# Altium PCB ConnerHorn_Hat_PCB_Group26.PcbDoc
Units mm, origin at the board's own origin, x right, y up, seen from the top; angles counter-clockwise.
Board outline 64 x 85 mm, 4 copper layers (Top Layer, Ground Plane, Power Plane, Bottom Layer), stack 0.844 mm thick; 100 components, 57 nets, 298 pads, 54 vias.
Unrouted connection lines stored in the file: 5.
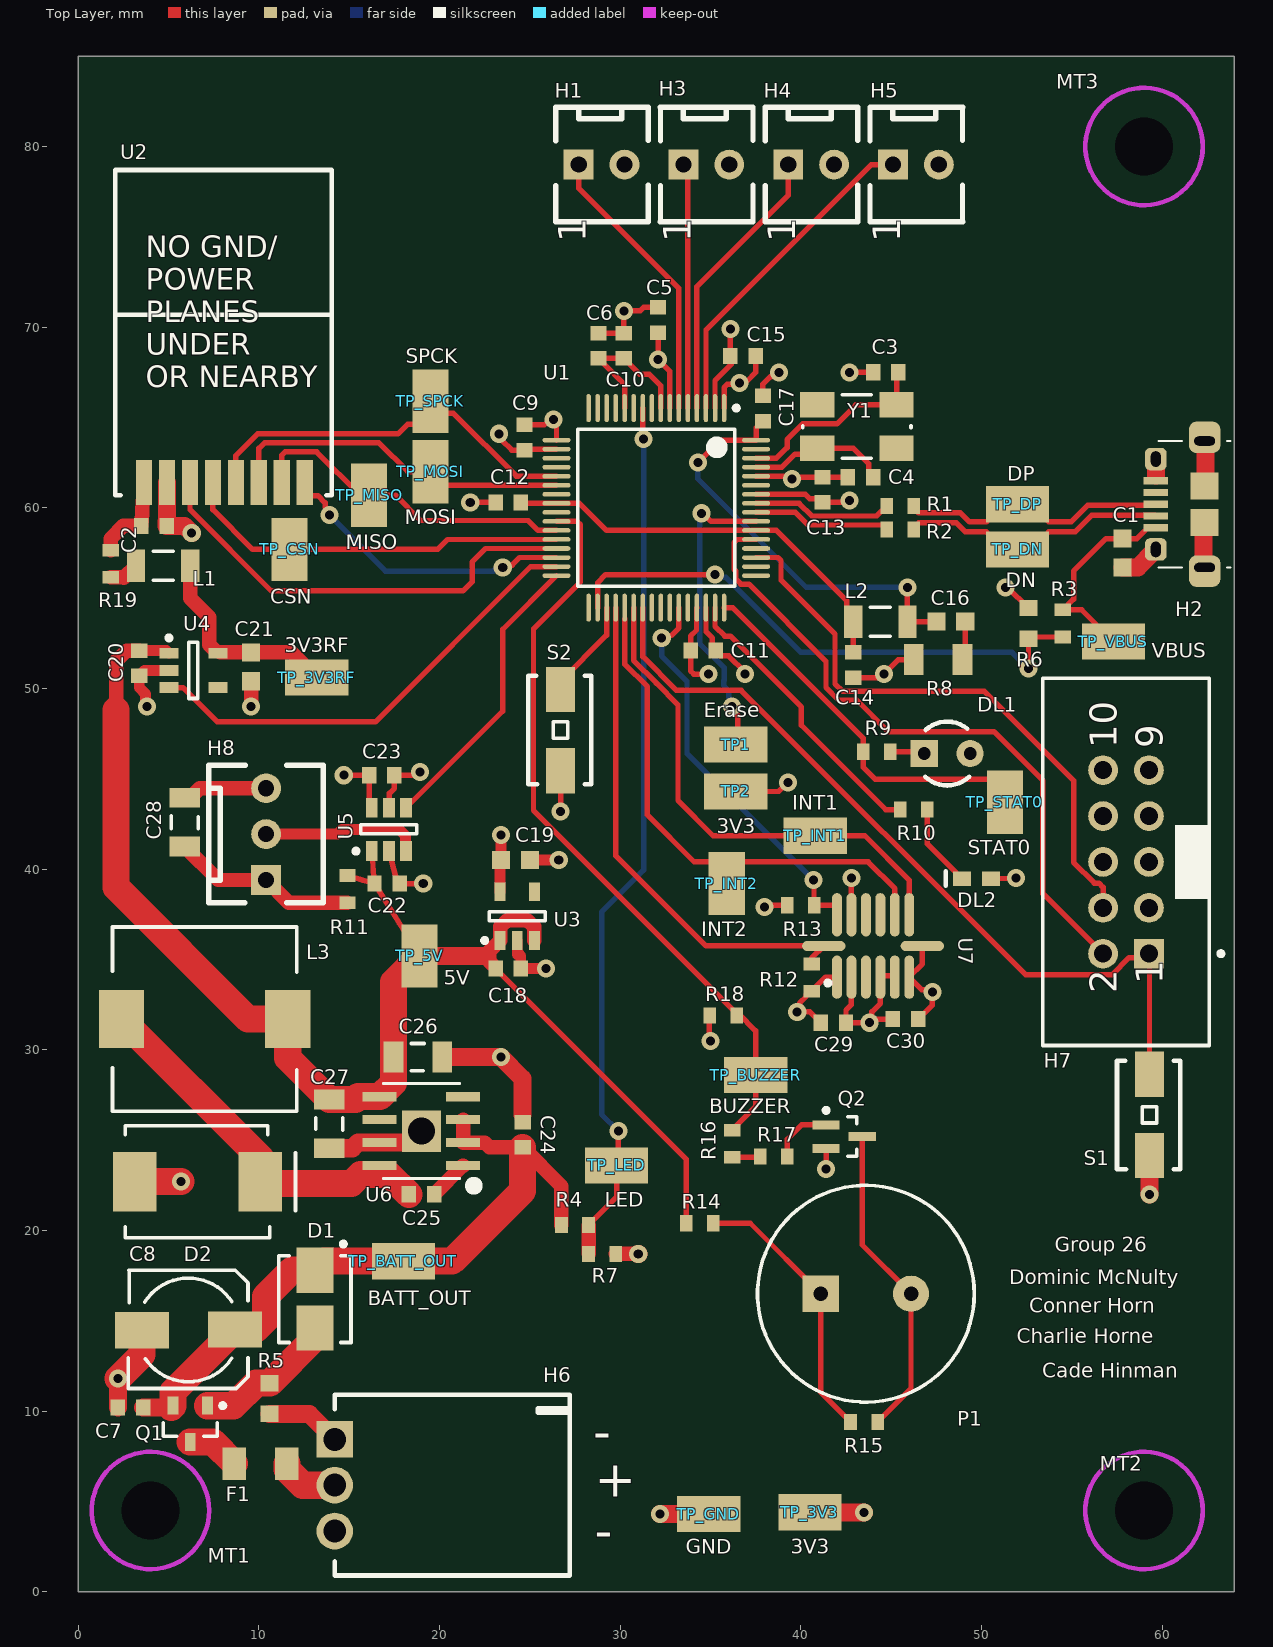
[diagram p0: Top Layer view]
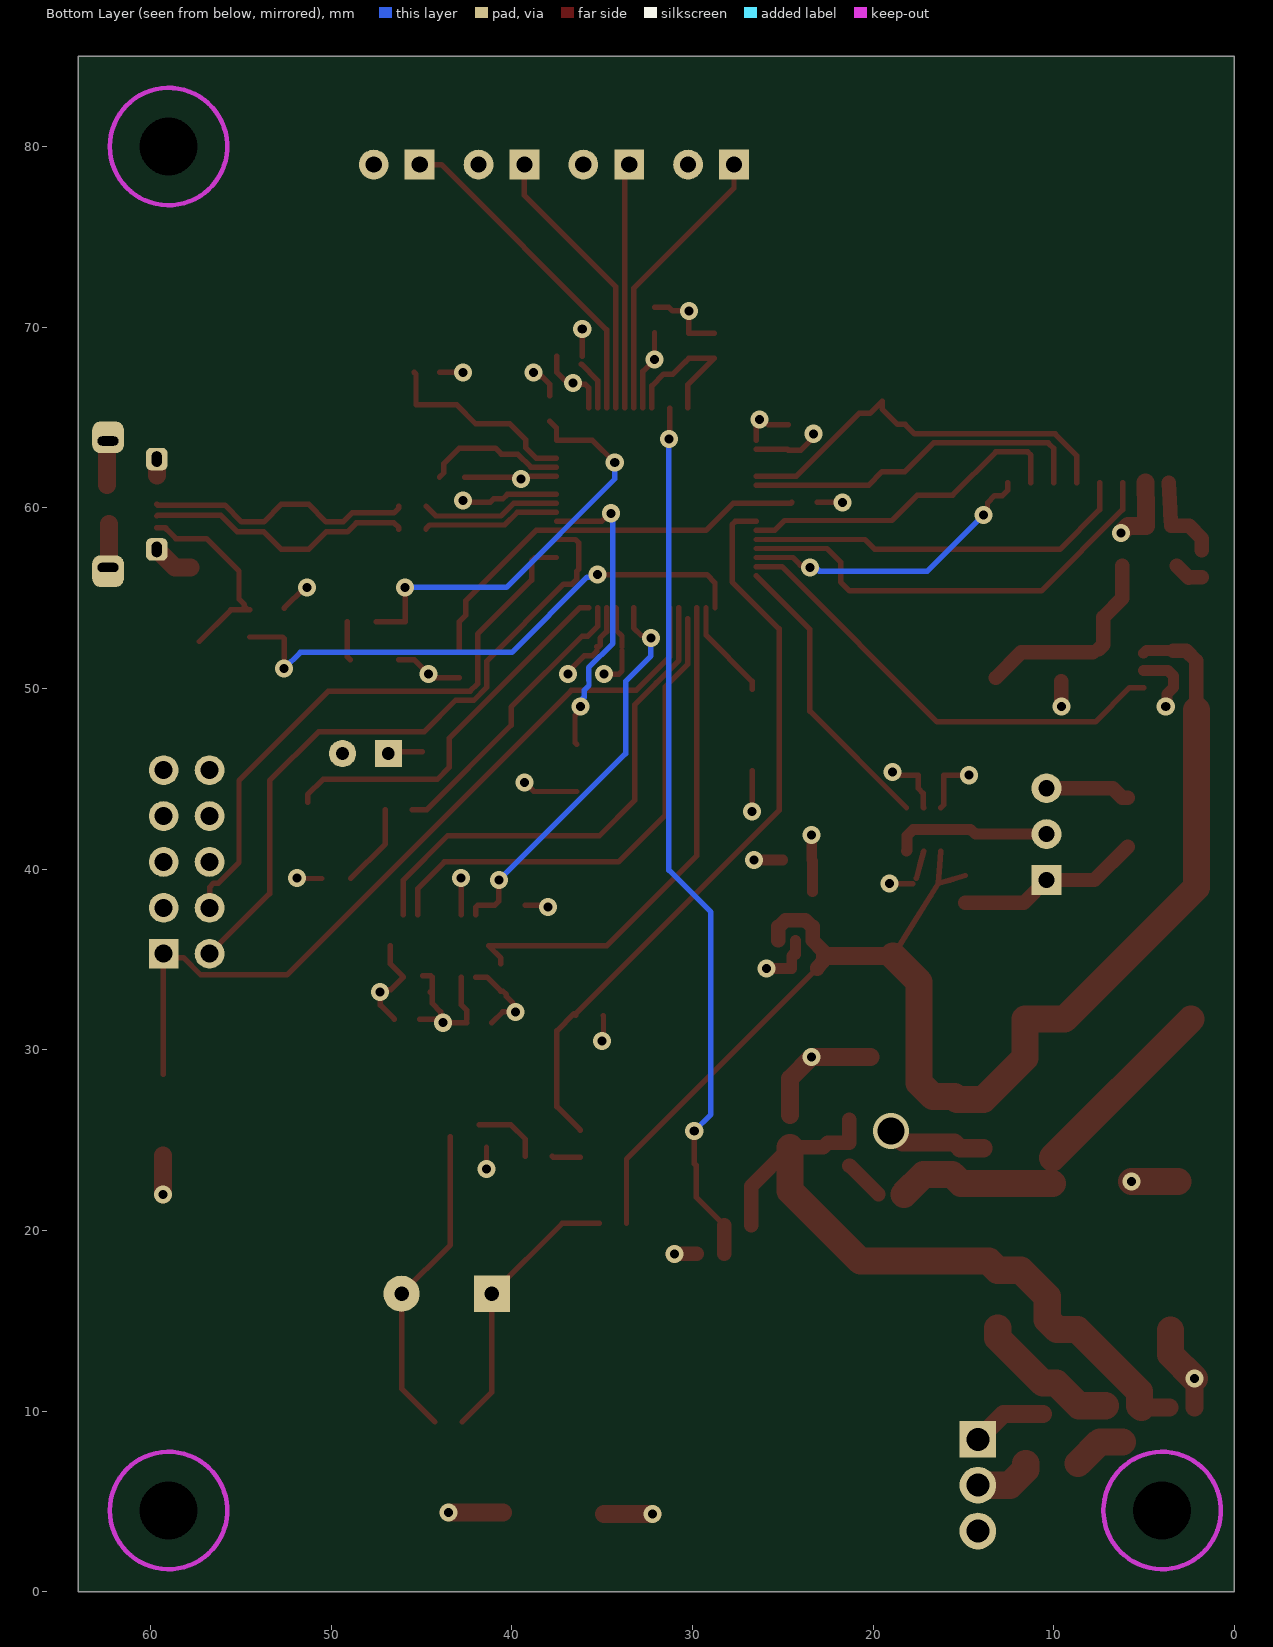
[diagram p1: Bottom Layer view, seen from below]
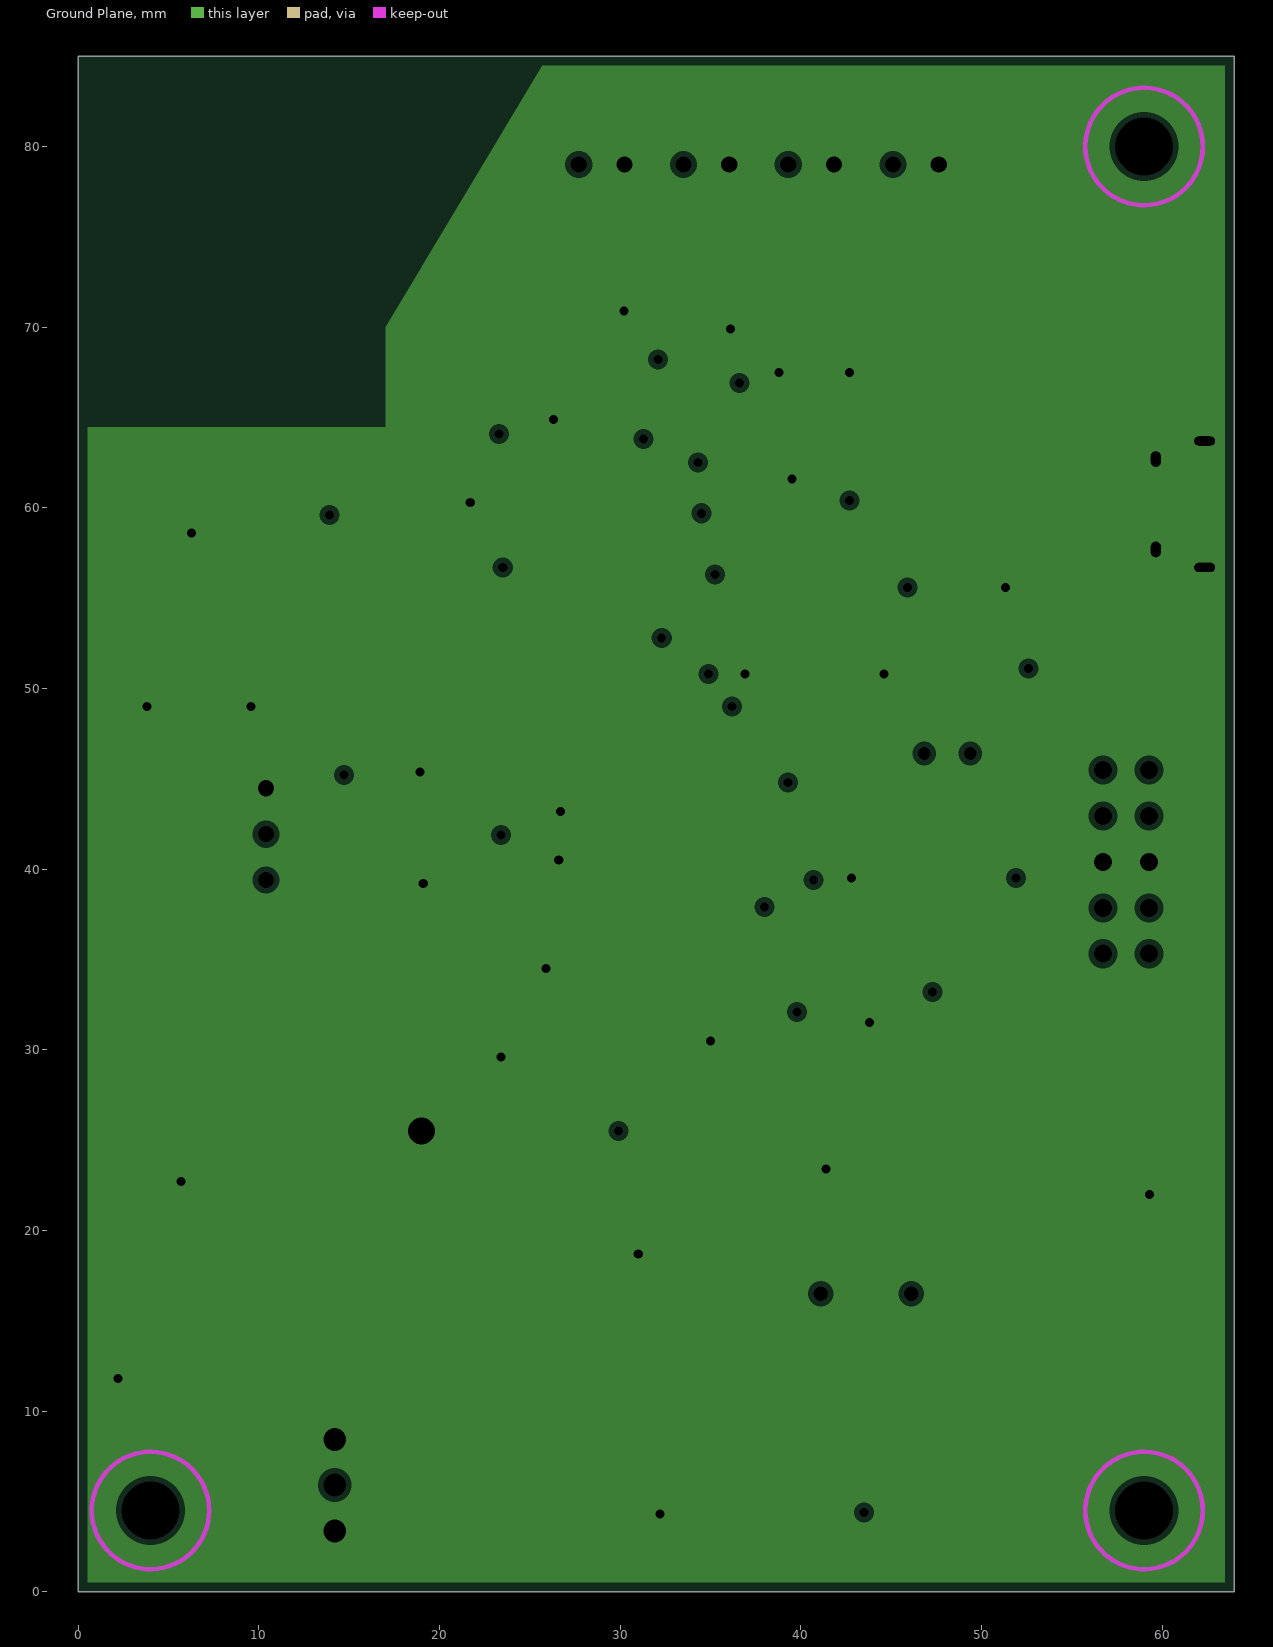
[diagram p2: Ground Plane, clearances drawn from the general rule]
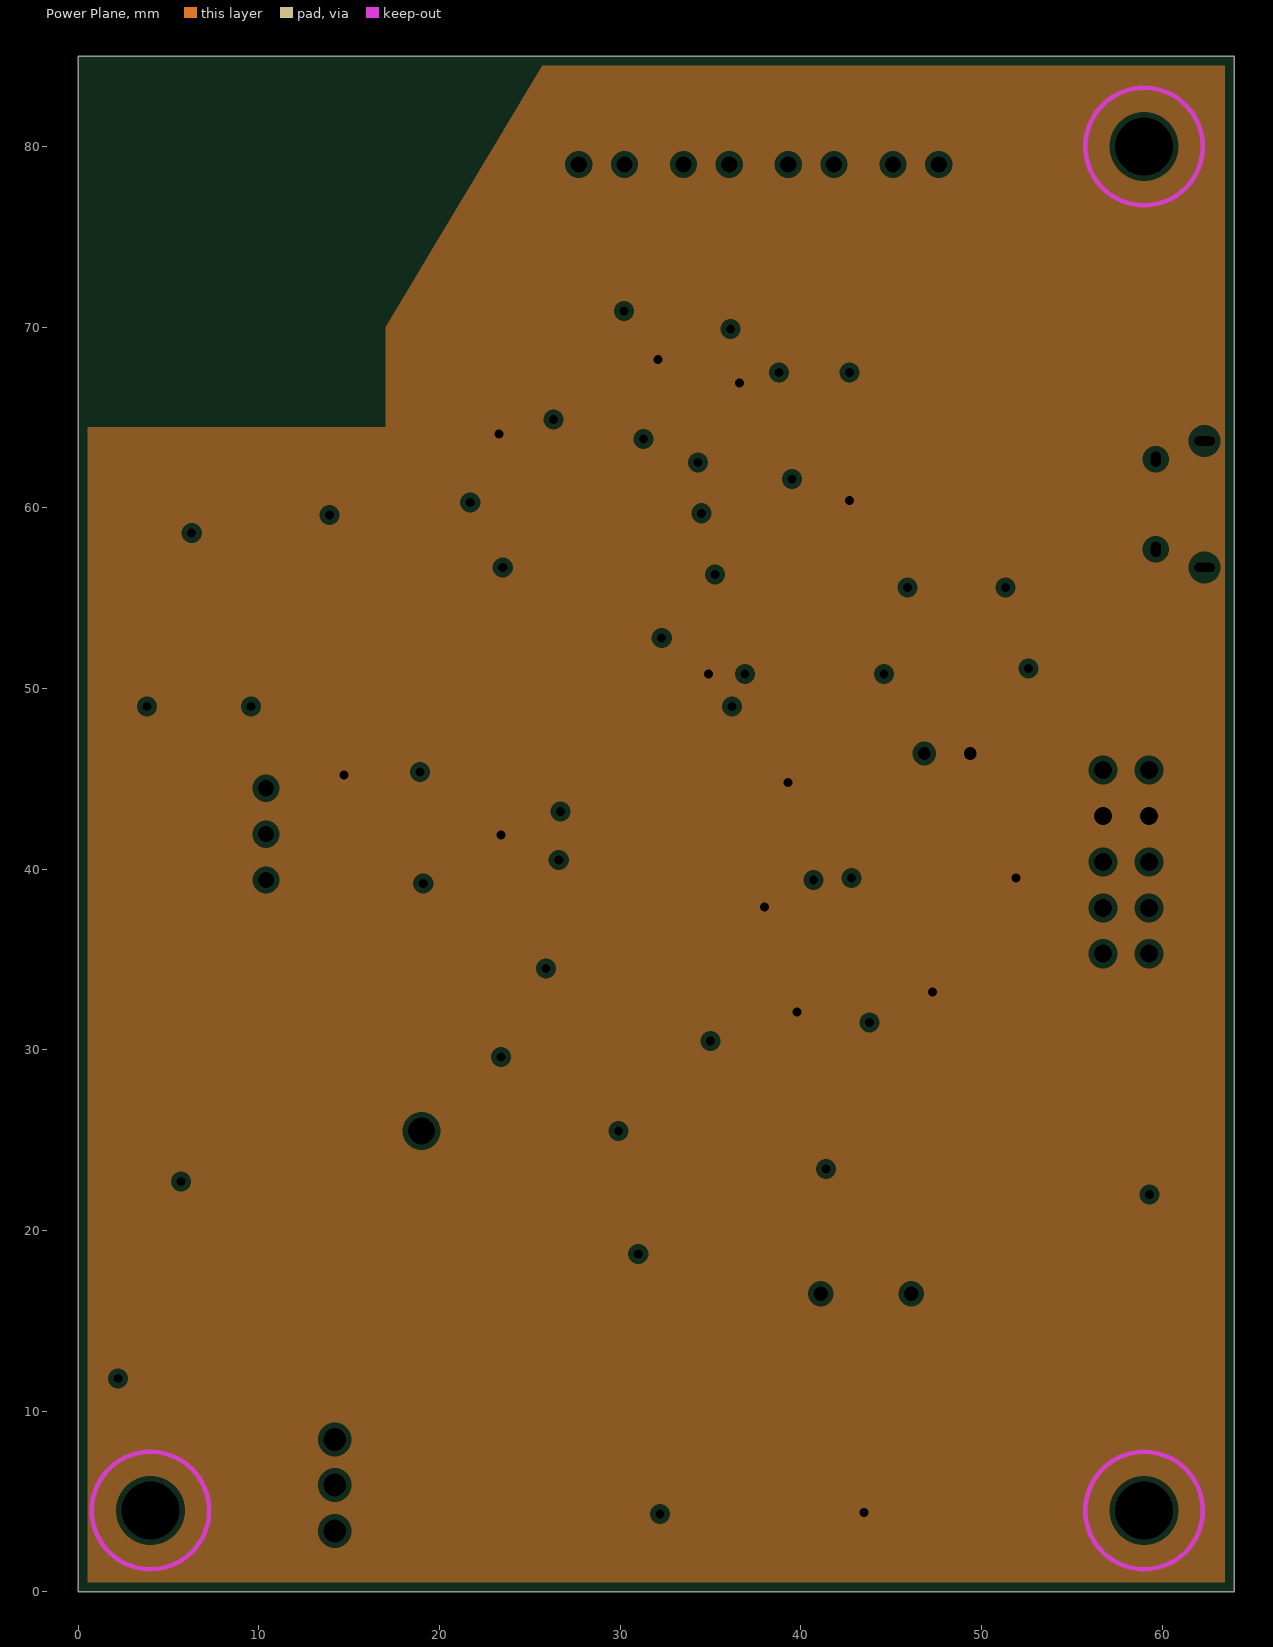
[diagram p3: Power Plane, clearances drawn from the general rule]

## Layer stack, top to bottom
Top Solder: solder mask 0.0102, Solder Resist, Dk 3.5
Top Layer: signal copper 0.0356
Dielectric 1: core 0.32, FR-4, Dk 4.8
Ground Plane: plane copper 0.036, net GND
Dielectric 3: prepreg 0.127, Dk 4.2
Power Plane: plane copper 0.036, net 3V3
Dielectric 4: core 0.254, Dk 4.2
Bottom Layer: signal copper 0.0356
Bottom Solder: solder mask 0.0102, Solder Resist, Dk 3.5

## Board outline
0,85 64,85 64,0 0,0 0,85

## Design rules (kind name [scope] priority, off if disabled: settings)
BoardOutlineClearance [All] p1: gap=0.5 ignorepadtopadclearanceinfootprint=FALSE
Clearance GND_POLY [InNamedPolygon('GND')] p1: gap=0.254 ignorepadtopadclearanceinfootprint=FALSE
Clearance Min_Clearance_Circuit_Labs [All] p2: gap=0.2 ignorepadtopadclearanceinfootprint=FALSE
DiffPairsRouting [All] p1: maxlimit=0.254 minlimit=0.2 mostfreqgap=0.254 toplayer_minwidth=0.254 toplayer_maxwidth=0.381 toplayer_prefwidth=0.381 bottomlayer_minwidth=0.254 bottomlayer_maxwidth=0.381 bottomlayer_prefwidth=0.381 maxuncoupledlength=12.7
FanoutControl Fanout_BGA [IsBGA] p1 off: bgadir=Out bgaviamode=Centered fanoutstyle=Auto fanoutdirection=Alternating viagrid=0.025 // Fanout_BGA (Default Rule)
Height [All] p1: minheight=0 maxheight=50.8 prefheight=12.7
HoleSize [All] p1: absolutevalues=TRUE maxlimit=10 minlimit=0.3 maxpercent=80.000 minpercent=20.000
MinimumAnnularRing [All] p1: minimumring=0.1
MinimumSolderMaskSliver [All] p1: minsoldermaskwidth=0.102
NetAntennae [All] p1: netantennaetolerance=1
PlaneClearance [All] p1: clearance=0.305
PlaneConnect [All] p1: planeconnectstyle=Direct reliefexpansion=0.508 reliefentries=4 reliefconductorwidth=0.254 reliefairgap=0.254
PolygonConnect [All] p1: connectstyle=Relief reliefconductorwidth=0.305 reliefentries=4 polygonreliefangle="90 Angle" airgapwidth=0.254
RoutingVias [All] p1: holewidth=0.5 width=1 viastyle="Through Hole" minholewidth=0.3 minwidth=0.8 maxholewidth=1 maxwidth=2
SMDNeckDown [All] p1 off: percent=50.000
SMDToCorner [All] p1: distance=98425
SMDToPlane [All] p1: distance=1968504
SilkToSolderMaskClearance SilkscreenOverComponentPads [IsPad] p1: minsilkscreentomaskgap=0.2 clearancetoexposedcopper=TRUE
SolderMaskExpansion [All] p1: expansion=0.102 istentingtop=FALSE
ViasUnderSMD [All] p1: allowed=FALSE
Width [All] p1: maxlimit=2 minlimit=0.2 preferedwidth=0.3
21 further rules are at their usual default settings.

## Classes and differential pairs
component class Schematic_Hat_Secondary: C29 C30 P1 Q2 R12 R13 R14 R15 R16 R17 R18 TP_3V3 TP_3V3RF TP_5V TP_BATT_OUT TP_BUZZER TP_CSN TP_DN TP_DP TP_GND TP_INT1 TP_INT2 TP_LED TP_MISO TP_MOSI TP_SPCK TP_STAT0 TP_VBUS U7
component class Schematic_Hat_Main: C1 C2 C3 C4 C5 C6 C7 C8 C9 C10 C11 C12 C13 C14 C15 C16 C17 C18 C19 C20 C21 C22 C23 C24 C25 C26 C27 C28 D1 D2 DL1 DL2 F1 H1 H2 H3 H4 H5 H6 H7 H8 L1 L2 L3 MT1 MT2 MT3 Q1 R1 R2 R3 R4 R5 R6 R7 R8 R9 R10 R11 R19 S1 S2 TP1 TP2 U1 U2 U3 U4 U5 U6 Y1
differential pair D: +D_P -D_N

## Components (designator, comment, footprint, x,y, rotation, side; value= is the part's Value field where it differs from the comment)
C1 "4.7uF" CAPC1608N 57.8,57.5 r270 top
C2 "10uF" CAPC1608L 4.2,59 r180 top
C3 "27pF" CAPC1608L 44.7,67.5 r0 top
C4 "27pF" CAPC1608L 43.3,61.7 r0 top
C5 "100nF" CAPC1608L 32.1,70.4 r270 top
C6 "100nF" CAPC1608L 28.8,68.975 r270 top
C7 "100nF" CAPC1608L 2.9,10.2 r0 top
C8 "100uF/16V" NICH-1 6.1,14.5 r0 top
C9 "100nF" CAPC1608L 24.7,63.9 r270 top
C10 "100nF" CAPC1608L 30.2,68.975 r270 top
C11 "100nF" CAPC1608L 34.6,52.1 r180 top
C12 "100nF" CAPC1608L 23.8,60.3 r0 top
C13 "100nF" CAPC1608L 41.2,61 r270 top
C14 "100nF" CAPC1608L 42.9,51.3 r90 top
C15 "100nF" CAPC1608L 36.8,68.4 r0 top
C16 "4.7uF" CAPC1608N 48.3,53.7 r180 top
C17 "100nF" CAPC1608L 37.9,65.5 r270 top
C18 "1uF" CAPC1608L 23.8,34.5 r180 top
C19 "4.7uF" CAPC1608N 24.2,40.5 r180 top
C20 "1uF" CAPC1608L 3.375,51.4 r90 top
C21 "4.7uF" CAPC1608N 9.575,51.2 r90 top
C22 "1uF" CAPC1608L 17.1,39.2 r180 top
C23 "1uF" CAPC1608L 16.8,45.2 r180 top
C24 "10uF" CAPC1608L 24.6,25.3 r270 top
C25 "100nF" CAPC1608L 19,22 r0 top
C26 "22uF" CAPC3216L 18.8,29.6 r180 top
C27 "22uF" CAPC3216L 13.9,25.9 r90 top
C28 "22uF" CAPC3216L 5.9,42.6 r270 top
C29 "1uF" CAPC1608L 41.8,31.5 r180 top
C30 "10uF" CAPC1608L 45.8,31.7 r0 top
D1 "DIODE ZENER 5.6V" DO-214AA_SCL 13.1,16.2 r270 top
D2 "MBRS330T3G 30V 4A" SMC 6.6,22.7 r0 top
DL1 "DL_LED3mm" LED3MMTH 48.1,46.4 r0 top
DL2 "Green" WL-SMCW0603 48.918,39.482 r0 top
F1 "5A" RESC3216N 10.1,7.1 r180 top
H1 "2 Pin Molex KK HDR" MOLEX_KK_2_HDR 27.7,79 r0 top
H2 "JS_USB_MICRO_B" FCI_USB_10118194-0001LF 63.8,60.2 r90 top
H3 "2 Pin Molex KK HDR" MOLEX_KK_2_HDR 33.5,79 r0 top
H4 "2 Pin Molex KK HDR" MOLEX_KK_2_HDR 39.3,79 r0 top
H5 "2 Pin Molex KK HDR" MOLEX_KK_2_HDR 45.1,79 r0 top
H6 "Battery_HEADER_3pin" BATT_HEADER_3POS 14.2,5.9 r270 top
H7 "Header 5X2 Vert" IDC2.54-V10D 58,40.4 r90 top
H8 "3 Pin Molex KK Hdr" MOLEX_KK_3_HDR 10.4,39.4 r90 top
L1 "1A max, Idc 0.3R," INDC3216L 4.7,56.8 r0 top
L2 "1A max, Idc 0.3R," INDC3216L 44.4,53.7 r180 top
L3 "IND 5.2UH 6A" INDUCTOR5u2 7,31.7 r0 top
MT1 "M3.2 NPTH" MNT-HOLE_3.2mm_NPTH 4,4.5 r0 top
MT2 "M3.2 NPTH" MNT-HOLE_3.2mm_NPTH 59,4.5 r0 top
MT3 "M3.2 NPTH" MNT-HOLE_3.2mm_NPTH 59,80 r0 top
P1 "Piezo Buzzer" BUZZER 41.1,16.5 r0 top
Q1 "SSM3J328R,LF" SOT23_L 6.2,9.3 r270 top
Q2 "BC817W" SOT323_M 42.4,25.2 r0 top
R1 "27R" RESC1608L 45.5,60.1 r180 top
R2 "27R" RESC1608L 45.5,58.8 r180 top
R3 "27K" RESC1608L 54.5,53.6 r90 top
R4 "300K" RESC1608L 27.5,20.3 r180 top
R5 "47K" RESC1608N 10.6,10.7 r90 top
R6 "47K" RESC1608N 52.6,53.6 r270 top
R7 "220K" RESC1608L 29,18.7 r180 top
R8 "1R" RESC3216L 47.6,51.6 r0 top
R9 "3K" RESC1608L 44.2,46.5 r180 top
R10 "2K" RESC1608L 46.25,43.3 r180 top
R11 "0R" RESC1608L 14.9,38.9 r90 top
R12 "2K2" RESC1608L 40.6,34 r270 top
R13 "2K2" RESC1608L 40,38 r180 top
R14 "0R" RESC1608L 34.4,20.4 r180 top
R15 "1K" RESC1608L 43.5,9.4 r180 top
R16 "10R" RESC1608L 36.2,24.8 r270 top
R17 "0R" RESC1608L 38.5,24.1 r180 top
R18 "1K" RESC1608L 35.7,31.9 r0 top
R19 "10R" RESC1608L 1.8,56.9 r270 top
S1 "EVQPNF05M" EVQPNF05M 59.3,26.4 r90 top
S2 "EVQPNF05M" EVQPNF05M 26.7,47.7 r90 top
TP1 "Erase" TP_1206 36.4,46.9 r180 top value=TP
TP2 "3V3" TP_1206 36.4,44.3 r180 top value=TP
TP_3V3 "3V3" TP_1206 40.5,4.4 r0 top value=TP
TP_3V3RF "3V3RF" TP_1206 13.2,50.6 r0 top value=TP
TP_5V "5V" TP_1206 18.9,35.2 r270 top value=TP
TP_BATT_OUT "BATT_OUT" TP_1206 18,18.3 r0 top value=TP
TP_BUZZER "BUZZER" TP_1206 37.5,28.6 r0 top value=TP
TP_CSN "CSN" TP_1206 11.7,57.7 r90 top value=TP
TP_DN "DN" TP_1206 52,57.7 r0 top value=TP
TP_DP "DP" TP_1206 52,60.2 r180 top value=TP
TP_GND "GND" TP_1206 34.9,4.3 r0 top value=TP
TP_INT1 "INT1" TP_1206 40.8,41.85 r180 top value=TP
TP_INT2 "INT2" TP_1206 35.9,39.2 r90 top value=TP
TP_LED "LED" TP_1206 29.8,23.6 r180 top value=TP
TP_MISO "MISO" TP_1206 16.1,60.7 r90 top value=TP
TP_MOSI "MOSI" TP_1206 19.5,62 r90 top value=TP
TP_SPCK "SPCK" TP_1206 19.5,65.9 r90 top value=TP
TP_STAT0 "STAT0" TP_1206 51.3,43.7 r90 top value=TP
TP_VBUS "VBUS" TP_1206 57.3,52.6 r180 top value=TP
U1 "ATSAM4S8BA-ANR" LQFP64_L 32,60 r270 top locked
U2 "nRF24 SMD" NRF24 2.043,60.7 r0 top
U3 "CAT6219-330TDGT3" SOT95P280X145-5N 24.3,37.4 r90 top
U4 "CAT6219-330TDGT3" SOT95P280X145-5N 6.375,51 r0 top
U5 "SN74LVC1T45" SOT23-6_N 17.2,42.2 r90 top
U6 "ADP2302ARDZ-5.0 BUCK" RD_8_1 19,25.5 r180 top locked value=Value
U7 "ADXL345BCCZ" ADI-CC-14-1_V 44,35.75 r90 top locked
Y1 "12MHz" 6.0X3.5-4 43.1,64.5 r0 top

## Footprints (in the part's own frame and the unit in brackets; to place one, negate y for a bottom-side part, rotate by r counter-clockwise, add the part's x,y. Pads: shape width x height; smd on the part's side, far side on the other; paste and mask are expansions set on the pad)
6.0X3.5-4 [mm] "4 SMD 6.0X3.5 mm No Lead Crystal"
  rect 1.9x1.4 smd: 1(-2.2,-1.2) 2(2.2,-1.2) 3(2.2,1.2) 4(-2.2,1.2)
  silkscreen extent -3,-1.75 3,1.75, body extent -3,-1.75 3,1.75, height 1.2
ADI-CC-14-1_V [mm]
  oval 2.4x0.55 smd: 1(-1.725,2) 2(-1.725,1.2) 3(-1.725,0.4) 4(-1.725,-0.4) 5(-1.725,-1.2) 6(-1.725,-2) 8(1.725,-2) 9(1.725,-1.2) 10(1.725,-0.4) 11(1.725,0.4) 12(1.725,1.2) 13(1.725,2)
  oval 0.55x2.4 smd: 7(0,-2.725) 14(0,2.725)
  silkscreen extent -2.18,2.37 -1.93,2.62, body extent -1.5,-2.5 1.5,2.5, height 1
BATT_HEADER_3POS [mil]
  rect 80x80 hole 50: 1(-100,0)
  round 80 hole 50: 2(0,0) 3(100,0)
  silkscreen extent -197,0 197,512, body extent -197,-31 200,504, height 294
BUZZER [mm]
  rect 2x2 hole 0.8: 1(0,0)
  round 2 hole 0.8: 2(5,0)
  silkscreen extent -3.5,-6 8.5,6, body extent -3.58,-6.08 8.58,6.08, height 6.5
CAPC1608L [mm] "Chip Capacitor, Body 1.6x0.8mm, IPC High Density"
  rect 0.8x0.9 smd: 1(-0.7,0) 2(0.7,0)
  body extent -0.87,-0.48 0.87,0.48, height 0.85
CAPC1608N [mm] "Chip Capacitor, Body 1.6x0.8mm, IPC Medium Density"
  rect 1x1 smd: 1(-0.8,0) 2(0.8,0)
  body extent -0.87,-0.48 0.87,0.48, height 0.85
CAPC3216L [mm] "Chip Capacitor, Body 3.2x1.6mm, IPC High Density"
  rect 1.1x1.7 smd: 1(-1.35,0) 2(1.35,0)
  silkscreen extent -0.35,-0.75 0.35,0.75, body extent -1.7,-0.9 1.7,0.9, height 1.35
DO-214AA_SCL [mm] "Molded Diode, 2-Leads, Body 4.40x3.62mm, IPC Medium Density"
  rect 2.5x2.05 smd: 1(-1.6,0) 2(1.6,0)
  silkscreen extent -3.17,-2 2.4,2
EVQPNF05M [mm] "Panansonic light touch SMD push button switch"
  rect 2.5x1.6 smd: 1(-2.25,0) 2(2.25,0)
  silkscreen extent -3,-1.7 3,1.8, body extent -3,-1.7 3,1.8, height 5
FCI_USB_10118194-0001LF [mm] "Micro USB B Type Receptacle"
  rect 0.4x1.35 smd mask+0.07: 1(-1.3,4.15) 2(-0.65,4.15) 3(0,4.15) 4(0.65,4.15) 5(1.3,4.15)
  rrect50% 1.75x1.75 hole 0.5 slot 1.15 at 90 deg copper offset -0.2,0 paste-2539.97 mask+0.1: 6(-3.5,1.45)
  rrect50% 1.25x1.2 hole 0.55 slot 0.85 at 0 deg: 6(-2.5,4.15) 6(2.5,4.15)
  rect 1.5x1.55 smd: 6(-1,1.45) 6(1,1.45)
  rrect50% 1.75x1.75 hole 0.5 slot 1.15 at 90 deg copper offset 0.2,0 paste-2539.97 mask+0.1: 6(3.5,1.45)
  silkscreen extent -3.5,0 3.5,4
IDC2.54-V10D [mm] "Connector; IDC, Low Profile Male Header, Thru-Hole; 10 Position; Vertical; Pitch 2.54 mm; Body 20.32 x 9.2 x 9.45 mm (LxWxH)"
  rect 1.65x1.65 hole 1: 1(-5.08,-1.27)
  round 1.65 hole 1: 2(-5.08,1.27) 3(-2.54,-1.27) 4(-2.54,1.27) 5(0,-1.27) 6(0,1.27) 7(2.54,-1.27) 8(2.54,1.27) 9(5.08,-1.27) 10(5.08,1.27)
  silkscreen extent -10.16,-5.38 10.16,4.6, body extent -10.16,-4.6 10.16,4.6, height 9.45
INDC3216L [mm] "Chip Inductor, Body 3.2x1.6mm, IPC High Density"
  rect 1x1.8 smd: 1(-1.5,0) 2(1.5,0)
  silkscreen extent -0.55,-0.8 0.55,0.8, body extent -1.75,-0.95 1.75,0.95, height 1.9
INDUCTOR5u2 [mm]
  rect 2.5x3.2 smd: 1(-4.6,0) 2(4.6,0)
  silkscreen extent -5.1,-5.1 5.1,5.1, body extent -5,-5 5,5, height 3.8
LED3MMTH [mm] "LED 3 mm Through Hole"
  rect 1.5x1.5 hole 0.7: 1(-1.27,0)
  round 1.5 hole 0.7: 2(1.27,0)
  silkscreen extent -1.22,-1.77 1.22,1.77
LQFP64_L [mm] "Thin QFP, 64-Leads, Body 10x10mm, Pitch 0.5mm, IPC High Density"
  oval 1.55x0.25 smd mask+0.07: 1(-5.525,3.75) 2(-5.525,3.25) 3(-5.525,2.75) 4(-5.525,2.25) 5(-5.525,1.75) 6(-5.525,1.25) 7(-5.525,0.75) 8(-5.525,0.25) 9(-5.525,-0.25) 10(-5.525,-0.75) 11(-5.525,-1.25) 12(-5.525,-1.75) 13(-5.525,-2.25) 14(-5.525,-2.75) 15(-5.525,-3.25) 16(-5.525,-3.75) 33(5.525,-3.75) 34(5.525,-3.25) 35(5.525,-2.75) 36(5.525,-2.25) 37(5.525,-1.75) 38(5.525,-1.25) 39(5.525,-0.75) 40(5.525,-0.25) 41(5.525,0.25) 42(5.525,0.75) 43(5.525,1.25) 44(5.525,1.75) 45(5.525,2.25) 46(5.525,2.75) 47(5.525,3.25) 48(5.525,3.75)
  oval 0.25x1.55 smd mask+0.07: 17(-3.75,-5.525) 18(-3.25,-5.525) 19(-2.75,-5.525) 20(-2.25,-5.525) 21(-1.75,-5.525) 22(-1.25,-5.525) 23(-0.75,-5.525) 24(-0.25,-5.525) 25(0.25,-5.525) 26(0.75,-5.525) 27(1.25,-5.525) 28(1.75,-5.525) 29(2.25,-5.525) 30(2.75,-5.525) 31(3.25,-5.525) 32(3.75,-5.525) 49(3.75,5.525) 50(3.25,5.525) 51(2.75,5.525) 52(2.25,5.525) 53(1.75,5.525) 54(1.25,5.525) 55(0.75,5.525) 56(0.25,5.525) 57(-0.25,5.525) 58(-0.75,5.525) 59(-1.25,5.525) 60(-1.75,5.525) 61(-2.25,5.525) 62(-2.75,5.525) 63(-3.25,5.525) 64(-3.75,5.525)
  silkscreen extent -5.65,-4.35 4.35,4.55, body extent -5,-5 5,5, height 1.6
MNT-HOLE_3.2mm_NPTH [mm] "Mounting Hole 3.2mm non plated"
  round 0 hole 3.2 unplated: 1(0,0)
  Keep-Out Layer circle w0.254: c0,0 r3.25
MOLEX_KK_2_HDR [mil] "MOLEX_KK_2_HDR"
  rect 65x65 hole 35.43: 1(0,0)
  round 65 hole 35.43: 2(100,0)
  silkscreen extent -50,-125 152,125, body extent -42,-124 152,126, height 420
MOLEX_KK_3_HDR [mil] "MOLEX_KK_3_HDR"
  rect 65x65 hole 35.43: 1(0,0)
  round 65 hole 35.43: 2(100,0) 3(200,0)
  silkscreen extent -50,-125 250,125, body extent -50,-114 250,114, height 461
NICH-1 [mm] "Electrolytic capacitor"
  rect 3x2 smd: 1(-2.561,-0.022) 2(2.584,0.011)
  silkscreen extent -3.34,-3.25 3.3,3.3, body extent -3.2,-3.2 3.2,3.2, height 5.3
NRF24 [mm]
  rect 0.9x2.5 smd: 1(1.6,0.7) 2(2.871,0.7) 3(4.143,0.7) 4(5.414,0.7) 5(6.686,0.7) 6(7.957,0.7) 7(9.229,0.7) 8(10.5,0.7)
  silkscreen extent 0,0 12,18, body extent 0,0 12,18, height 2.27
RD_8_1 [mil]
  rect 74x20 smd paste+0 mask+0: 1(-91,75) 2(-91,25) 3(-91,-25) 4(-91,-75) 5(91,-75) 6(91,-25) 7(91,25) 8(91,75)
  rect 84.65x90 smd paste-44.5 mask+0: EPAD(0,0)
  silkscreen extent -118,-104 84,123, body extent 0,0 10,10, height 10
RESC1608L [mm] "Chip Resistor, Body 1.6x0.8mm, IPC High Density"
  rect 0.7x0.9 smd: 1(-0.75,0) 2(0.75,0)
  body extent -0.85,-0.48 0.85,0.48, height 0.9
RESC1608N [mm] "Chip Resistor, Body 1.6x0.8mm, IPC Medium Density"
  rect 0.9x1 smd: 1(-0.85,0) 2(0.85,0)
  body extent -0.85,-0.48 0.85,0.48, height 0.6
RESC3216L [mm] "Chip Resistor, Body 3.1x1.6mm, IPC High Density"
  rect 1.1x1.7 smd: 1(-1.35,0) 2(1.35,0)
  body extent -1.68,-0.87 1.68,0.87, height 2.54
RESC3216N [mm] "Chip Resistor, Body 3.2x1.6mm, IPC Medium Density"
  rect 1.3x1.8 smd: 1(-1.45,0) 2(1.45,0)
  body extent -1.68,-0.87 1.68,0.87, height 0.71
SMC [mm] "DO-214-AB/SMC; 2 C-Bend Leads; Body 7.9 x 5.9 mm, inc. leads (LxW)"
  rect 2.4x3.3 smd: 1(-3.475,0) 2(3.475,0)
  silkscreen extent -4,-3.1 5.43,3.1, body extent -4.22,-2.95 3.72,2.95, height 2.27
SOT23-6_N [mm]
  rect 1.1x0.65 smd: 1(-1.2,0.95) 2(-1.2,0) 3(-1.2,-0.95) 4(1.2,-0.95) 5(1.2,0) 6(1.2,0.95)
  silkscreen extent -1.32,-1.55 0.25,1.95, body extent -0.9,-1.55 0.9,1.55, height 1.45
SOT23_L [mm] "SOT23, 3-Leads, Body 2.9x1.3mm, Pitch 0.95mm, Lead Span 2.3mm, IPC High Density"
  rect 1x0.6 smd: 1(-1,0.95) 2(-1,-0.95) 3(1,0)
  silkscreen extent -1.12,-1.5 0.7,1.93, body extent -0.7,-1.5 0.7,1.5, height 1.1
SOT95P280X145-5N [mm] "SOT23, 5-Leads, Body 2.90x2.80mm, Pitch 0.95mm, IPC Medium Density"
  rect 1.05x0.6 smd: 1(-1.35,0.95) 2(-1.35,0) 3(-1.35,-0.95) 4(1.35,-0.95) 5(1.35,0.95)
  silkscreen extent -1.47,-1.55 0.25,1.92, body extent -0.87,-1.52 0.87,1.53, height 1.45
SOT323_M [mm] "SOT323, 3-Leads, Body 2.0x1.3mm, Pitch 0.65mm, Lead Span 2.1mm, IPC Low Density"
  rect 1.5x0.5 smd: 1(-1,0.65) 2(-1,-0.65) 3(1,0)
  silkscreen extent -1.12,-1.1 0.7,1.57, body extent -0.7,-1.1 0.7,1.1, height 1.1
TP_1206 [mm] "Test Point Pad"
  rect 3.5x2 smd: 1(0,0)
  body extent -1.62,-0.85 1.63,0.8, height 2
WL-SMCW0603 [mm] "2.4 x 0.8 x 0.7mm LED"
  rect 1x0.8 smd: 1(0,0) 2(1.6,0)
  silkscreen extent -0.9,-0.4 -0.9,0.4

## Part data
C1 C16 C19 C21: library part CC_4.7uF_0603, "CAP CER 4.7uF X5R +-20%  10V 0603", Max Voltage=10V, Code_IPC=2012[0805], Note="Footprint corresponds to dimensions for bulk cassette packaging. This case size has tightened tolerances.", PackageReference=0805, Storage Location="PCB Assembly WS", Supplier="ECE Dept"
C2 C24 C30: library part CC_10uF_0603, "CAP CER 10UF X5R +-20% 6V3 0603", Voltage - Rated=6.3V, Storage Location="PCB Assembly WS", Supplier="ECE Dept"
C3 C4: library part CC_27pF_0603, "CAP CER 27pF NPO/COG +-5% 50V 0603", Code_IPC="1608 [0603]", PackageReference=0603, Storage Location="PCB Assembly WS", Supplier="ECE Dept"
C5 C6 C7 C9 C10 C11 C12 C13 C14 C15 C17 C25: library part CC_100nF_0603, "CAP CER 100nF X7R +-10% 50V 0603", Code_IPC="1608 [0603]", PackageReference=0603, Storage Location="PCB Assembly WS", Supplier="ECE Dept"
C8: library part CA_100uF_16V, "CAP ALUM 100uF 16V SMD", Manufacturer=Nichcon, Manufacturer PN=UWX1C101MCL1GB, Supplier Part Number 1=1870677, Storage Location="PCB Assembly WS", Supplier="ECE Dept", Supplier 1=Farnell, Supplier 2=Digi-Key, Supplier Part Number 2=493-2105-1-ND
C18 C20 C22 C23 C29: library part CC_1uF_0603, "CAP CER 1uF Y5V -20% +80% 16V 0603", Max Voltage=16V, Code_IPC="1608 [0603]", PackageReference=0603, Storage Location="PCB Assembly WS", Supplier="ECE Dept"
C26 C27 C28: library part CC_22uF_1206, "CAP CER 22uF Y5V -20% +80% 10V 1206", Dielectric=Y5V, Max Voltage=10V, Storage Location="PCB Assembly WS", Supplier="ECE Dept"
D1: library part SMBJ5339B-TP, "DIODE ZENER 5.6V 5W DO214AA", Base Part Number=SMBJ5339, Manufacturer="Micro Commercial Co", Operating Temperature="-55°C ~ 150°C", Package / Case="DO-214AA, SMB", Supplier Device Package="DO-214AA (SMB)", Supplier Part Number 1=SMBJ5339B-TPMSCT-ND, Tolerance=±5%, Category="Discrete Semiconductor Products", ComponentLink1Description=http://www.mccsemi.com/up_pdf/SMBJ5338B-SMBJ5388B(SMB).pdf, ComponentLink1URL=http://www.mccsemi.com/up_pdf/SMBJ5338B-SMBJ5388B(SMB).pdf, Manufacturer Part Number=SMBJ5339B-TP, Mounting Type="Surface Mount", Packaging="Cut Tape (CT)", Part Status=Active, Pricing 1="1=1.47, 10=1.277, 25=1.1312, 100=0.9853, 250=0.85764, 500=0.72988, 1000=0.58391 (NZD)", RoHS="RoHS Compliant", Stock 1=85990, Supplier 1=Digi-Key
D2: library part MBRS330T3G, "SCHOTTKY  30V 4A", Base Part Number=MBRS330, Capacitance @ Vr, F=-, Current - Average Rectified (Io)=4A, Manufacturer="ON Semiconductor", Operating Temperature - Junction="-65°C ~ 150°C", Package / Case="DO-214AB, SMC", Supplier Device Package=SMC, Supplier Part Number 1=MBRS330T3GOSCT-ND, Category="Discrete Semiconductor Products", ComponentLink1Description=http://www.onsemi.com/pub/Collateral/MBRS340T3-D.PDF, ComponentLink1URL=http://www.onsemi.com/pub/Collateral/MBRS340T3-D.PDF, Diode Type=Schottky, Manufacturer Part Number=MBRS330T3G, Mounting Type="Surface Mount", Packaging="Cut Tape (CT)", Part Status=Active, Pricing 1="1=0.93, 10=0.79, 100=0.5902, 500=0.46368, 1000=0.35829 (NZD)", RoHS="RoHS Compliant", Speed="Fast Recovery =< 500ns, > 200mA (Io)", Stock 1=8919, Supplier 1=Digi-Key
DL1: "LED 3mm Dia Thru Hole", Supplier Part Number 1=1497967, Storage Location="ECE Store", Supplier="ECE Dept", Supplier 1=Farnell
DL2: library part DL_150060GS75000, "LED Green 430mcd 0603 SMD", Forward Current If=30, Forward Voltage=3.2, Manufacturer="WURTH ELEKTRONIK", Manufacturer Part Number=150060GS75000, Supplier Part Number 1=2322070, LED Colour=Green, LED Mounting=SMD, Lens Shape=Rectangular, Luminous Intensity=430, Storage Location="PCB Assembly WS", Supplier="ECE Dept", Supplier 1=Farnell, Viewing Angle=140°, Wavelength Typ=520
F1: library part FS_Fuse_5.0A, "Fuse 5.0A Fast Acting 1206 SMD", Case Code (Imperial)=1206, Case Code (Metric)=3216, DC Cold Resistance=19mR, Manufacturer="Bel TRP", Manufacturer Part Number=C1F5, Max Operating Temperature=125°C, Min Operating Temperature=-55°C, Supplier Part Number 1=507-1886-1-ND, Voltage Rating=125V, Voltage Rating (DC)=63V, Approvals=CE,cURus, Case/Package=1206, ComponentLink1Description=http://www.farnell.com/datasheets/2571625.pdf, ComponentLink1URL=http://www.farnell.com/datasheets/2571625.pdf, ComponentLink2Description=http://belfuse.com/pdfs/C1F.pdf, ComponentLink2URL=http://belfuse.com/pdfs/C1F.pdf, ComponentLink3Description=http://www.mouser.com/ds/2/643/C1F-594910.pdf, ComponentLink3URL=http://www.mouser.com/ds/2/643/C1F-594910.pdf, ComponentLink4Description=https://belfuse.com/resources/StewartConnector/C1F.pdf, ComponentLink4URL=https://belfuse.com/resources/StewartConnector/C1F.pdf, Contact Plating=Nickel,Tin, Current Rating=5A, Fuse Type="Board Mount (Cartridge Style Excluded)", Length=0.126inch, Mount="Surface Mount", Number of Pins=2, Packaging="Tape and Reel", Pricing 1="1=0.32, 5=0.312, 10=0.298, 50=0.2662, 100=0.2479, 250=0.22032, 500=0.1836, 1000=0.17442 (USD)", Stock 1=725, Supplier 1=Digi-Key, Supplier 2=Element14, Supplier Part Number 2=2848595, Voltage Rating (AC)=125V, Width=0.062inch
H1 H3 H4 H5: library part JA_MOLEX_KK_2POS, "CONN HEADER 2POS 2.54mm VERT_Thru Hole", Supplier Part Number 1=1462926, Storage Location="ECE Dept Store", Supplier="ECE Dept", Supplier 1=Farnell
H2: library part JS_USB_MICRO_B_SMT, "CONN USB MICRO B RECPT SMT R/A", Manufacturer=FCI, Manufacturer Part Number=10118194-0001LF, Supplier Part Number 1=609-4618-1-ND, Features="Shielded, Solder Retention", Gender=Receptacle, Mounting Type="Surface Mount, Right Angle, Horizontal", Number of Contacts=5, Specifications="USB 2.0", Supplier 1=Digi-Key
H6: "3Pin Header 2.54mm spacing / Digikey #WM22663-ND", Supplier Part Number 1=WM22663-ND, Supplier 1=Digi-Key
H7: library part JA_HDR_IDC_5X2_VERT, "IDC Header, 2,54mm, 10-Pin, Vert", Supplier Part Number 1=1096985, Storage Location="ECE Dept Store", Supplier="ECE Dept", Supplier 1=Farnell
H8: library part LED_Strip_Header, "CONN HEADER 3POS 2.54mm VERT_Thru Hole", Manufacturer=Molex, Manufacturer PN=22-23-2031, Supplier Part Number 1=9731156, Storage Location="ECE Dept Store", Supplier="ECE Dept", Supplier 1=Farnell
L1 L2: library part IN_Ferrite-Bead, "Ferrite Bead, Rdc 0.3R, Z100MHZ 600R, Imax 1A, SMD 1206", DC Current Rating=1, DC Resistance Max=0.08, Ferrite Case Style="1206 ^3216 Metric]", Frequency Range="50MHz to 1", Impedance Tolerance="± 25%", Manufacturer=FAIR-RITE, Manufacturer Part Number=2512066017Y1, Supplier Part Number 1=1612060, Ferrite Mounting=SMD, Impedance=600, Manufacturer PN=2512066017Y1, Storage Location="PCB Assembly WS", Supplier="ECE Dept", Supplier 1=Farnell
L3: library part CDRH104RNP-5R2NC, "FIXED IND 5.2UH 6A 22 MOHM SMD", Current - Saturation=5.6A, DC Resistance (DCR)="22 mOhm Max", Frequency - Self Resonant=-, Manufacturer="Sumida America Components Inc.", Operating Temperature="-40°C ~ 100°C", Package / Case=Nonstandard, Supplier Part Number 1=308-2280-1-ND, Tolerance=±30%, Category="Inductors, Coils, Chokes", ComponentLink1Description=http://products.sumida.com/products/pdf/CDRH104R.pdf, ComponentLink1URL=http://products.sumida.com/products/pdf/CDRH104R.pdf, Height - Seated (Max)="0.157\" (4.00mm)", Manufacturer Part Number=CDRH104RNP-5R2NC, Material - Core=Ferrite, Mounting Type="Surface Mount", Packaging="Cut Tape (CT)", Part Status=Active, Pricing 1="1=2.9, 10=2.678, 100=1.8743, 500=1.5173 (NZD)", Q @ Freq=-, Ratings=-, RoHS="RoHS Compliant", Shielding=Shielded, Size / Dimension="0.402\" L x 0.394\" W (10.20mm x 10.00mm)", Stock 1=3849, Supplier 1=Digi-Key, Supplier Device Package=-, Type=-
MT1 MT2 MT3: library part MC_M3.2_HOLE, "Fixing M3.2 Mount Hole NPTH", Manufacturer=Hi-Q, Manufacturer PN="3BV series M3 Clearance", Price=0, Supplier="ECE Dept"
P1: "TDK - PS1240P02BT - BUZZER, PIEZO, 70DB, 12.2MM", Frequency=4kHz, Manufacturer 1=TDK, Manufacturer Part Number 1=PS1240P02BT, Max Operating Temperature=70°C, Min Operating Temperature=-10°C, Operating Supply Voltage=3V, Package Quantity=1, Supplier Part Number 1=445-2525-1-ND, ComponentLink1Description=https://datasheet.ciiva.com/0/ef532-ps-112.pdf?src-supplier=Digi-Key, ComponentLink1URL=https://datasheet.ciiva.com/0/ef532-ps-112.pdf?src-supplier=Digi-Key, ComponentLink2Description=https://datasheet.ciiva.com/0/ef532-ps-111.pdf?src-supplier=Digi-Key, ComponentLink2URL=https://datasheet.ciiva.com/0/ef532-ps-111.pdf?src-supplier=Digi-Key, ComponentLink3Description=https://datasheet.ciiva.com/3306/ef532-ps-3306958.pdf?src-supplier=Avnet, ComponentLink3URL=https://datasheet.ciiva.com/3306/ef532-ps-3306958.pdf?src-supplier=Avnet, ComponentLink4Description=https://datasheet.ciiva.com/16225/ef532-ps-16225062.pdf?src-supplier=Onlinecomponents.com, ComponentLink4URL=https://datasheet.ciiva.com/16225/ef532-ps-16225062.pdf?src-supplier=Onlinecomponents.com, Diameter=12.2mm, Height=6.5mm, Lead Free="Lead Free", Mount="Through Hole", Number of Pins=2, Number of Terminals/Pins=2, Packaging="Tape and Reel", Pricing 1="1=0.61000, 10=0.52500, 25=0.49120, 50=0.46580, 100=0.44110 (USD)", RoHS=Yes, RoHS Compliant=Yes, Series=PS, Stock 1=24025, Supplier 1=Digi-Key, Termination="PC Pins", Voltage Rating (DC)=3V, Washable=No
Q1: library part TM_SSM3J328R, "MOSFET P-CH 20V 6A SOT23-3", Case/Package=SOT-23-3, Continuous Drain Current (ID)=6A, Drain to Source Breakdown Voltage=-20V, Drain to Source Resistance=47.4mR, Drain to Source Voltage (Vdss)=20V, Gate to Source Voltage (Vgs)=8V, Input Capacitance=840pF, Input Capacitance (Ciss) @ Vds="840pF @ 10V", Manufacturer=Toshiba, Max Operating Temperature=150°C, Max Power Dissipation=1W, Min Operating Temperature=-55°C, Package / Case="SOT-23-3 Flat Leads", Package Quantity=3000, Power Dissipation=2W, Supplier Device Package=SOT-23F, Supplier Part Number=SSM3J328RLFDKR-ND, ComponentLink1Description=https://datasheet.ciiva.com/11158/ssm3j328r-datasheet-en-20140301-11158652.pdf, ComponentLink1URL=https://datasheet.ciiva.com/11158/ssm3j328r-datasheet-en-20140301-11158652.pdf, Current - Continuous Drain (Id) @ 25° C=6A, Element Configuration=Single, FET Feature="Logic Level Gate, 1.5V Drive", FET Type="MOSFET P-Channel, Metal Oxide", Gate Charge (Qg) @ Vgs="12.8nC @ 4.5V", Manufacturer Part Number=SSM3J328R,LF, Mount="Surface Mount", Number of Channels=1, Number of Elements=1, Number of Pins=3, Packaging="Tape and Reel", Power - Max=1W, Pricing="1=0.79, 10=0.658, 25=0.5772, 100=0.4939, 250=0.42836, 500=0.36284, 1000=0.27972 (NZD)", Radiation Hardening=No, Rds On Max=29.8mR, Storage Location="PCB Assembly WS", Supplier=Digi-Key, Supplier 1=Digi-Key, Supplier Part Number 1=SSM3J328RLFDKR-ND, Turn-Off Delay Time=107ns, Turn-On Delay Time=32ns, Vgs(th) (Max) @ Id="1V @ 1mA"
Q2: library part TB_BC817W, "NPN GP Bipolar Transistor 45V 500mA SOT323", Manufacturer=NXP, Supplier Part Number 1=2114873, Manufacturer PN=BC817W, Storage Location="PCB Assembly WS", Supplier="ECE Dept", Supplier 1=Farnell, Supplier 2=Digi-Key, Supplier Part Number 2=1727-4843-1-ND
R1 R2: library part RS_27R, "RES 27 OHM 1/10W 5% 0603 SMD", Storage Location="PCB Assembly WS", Supplier="ECE Dept"
R3: library part RS_27K, "RES 27K OHM 1/10W 5% 0603 SMD", Storage Location="PCB Assembly WS", Supplier="ECE Dept"
R4: library part RS_300K, "RES 300K OHM 1/10W 5% 0603 SMD", Storage Location="PCB Assembly WS", Supplier="ECE Dept"
R5 R6: library part RS_47K, "RES 47.0K OHM 1/10W 5% 0603 SMD", Storage Location="PCB Assembly WS", Supplier="ECE Dept"
R7: library part RS_220K, "RES 3.3K OHM 1/10W 5% 0603 SMD", Storage Location="PCB Assembly WS", Supplier="ECE Dept"
R8: library part RT_1R, "RES 1R OHM 1/4W 5% 1206 SMD", Storage Location="PCB Assembly WS", Supplier="ECE Dept"
R9: library part RS_3K, "RES 3K OHM 1/10W 5% 0603 SMD", Storage Location="PCB Assembly WS", Supplier="ECE Dept"
R10: library part RS_2K, "RES 2K OHM 1/10W 5% 0603 SMD", Storage Location="PCB Assembly WS", Supplier="ECE Dept"
R11 R14 R17: library part RS_0R0, "RES 0.0 OHM 1/10W 5% 0603 SMD", Storage Location="PCB Assembly WS", Supplier="ECE Dept"
R12 R13: library part RS_2K2, "RES 2.2K OHM 1/10W 5% 0603 SMD", Storage Location="PCB Assembly WS", Supplier="ECE Dept"
R15 R18: library part RS_1K, "RES 1.0K OHM 1/10W 5% 0603 SMD", Storage Location="PCB Assembly WS", Supplier="ECE Dept"
R16 R19: library part RS_10R, "RES 10 OHM 1/10W 5% 0603 SMD", Storage Location="PCB Assembly WS", Supplier="ECE Dept"
S1 S2: library part WS_EVQPNF05M, "Panasonic 6 x 3.5mm SMD Light Touch Switch Type SMD", Manufacturer=Panasonic, Supplier Part Number 1=2079481, Manufacturer PN=EVQPNF05M, PackageDescription="6.0 x 3.5 mm", Storage Location="PCB Assembly WS", Supplier="ECE Dept", Supplier 1=Farnell, Supplier 2=Digi-Key, Supplier Part Number 2=P13598SCT-ND
TP1 TP2 TP_3V3 TP_3V3RF TP_5V TP_BATT_OUT TP_BUZZER TP_CSN TP_DN TP_DP TP_GND TP_INT1 TP_INT2 TP_LED TP_MISO TP_MOSI TP_SPCK TP_STAT0 TP_VBUS: library part TP_1206, "Test-Point 3.3x1.6x2.1mm SMD", Manufacturer="Harwin Inc", Manufacturer Part Number=S1751-46R, Supplier Part Number 1=952-1478-2-ND, Mounting Type="Surface Mount", Storage Location=ProtoPlace, Supplier="ECE Dept", Supplier 1=Digi-Key, Supplier 2=Farnell, Supplier Part Number 2=1826282, Type="PC Test Point"
U1: library part SE_ATSAM4S16BA-MU, "IC MCU 32BIT 512KB FLASH 64LQFP", Manufacturer=Atmel, Package / Case=64-LQFP, Supplier Part Number 1=ATSAM4S8BA-ANRCT-ND, Voltage - Supply (Vcc/Vdd)="1.62 V ~ 3.6 V", Code_JEDEC=MO-220VMMD-3, ComponentLink1Description="Manufacturer URL", ComponentLink1URL=http://www.atmel.com/, ComponentLink2Description="SAM4S Series Datasheet", ComponentLink2URL=http://www.atmel.com/dyn/resources/prod_documents/11100.pdf, ComponentLink3Description="SAM4S Series Summary", ComponentLink3URL=http://www.atmel.com/dyn/resources/prod_documents/11100S.pdf, Connectivity="I²C, IrDA, Memory Card, SPI, SSC, UART/USART, USB", Core Processor="ARM® Cortex®-M4", Core Size=32-Bit, Data Converters="A/D 11x12b, D/A 2x12b", Manufacturer Part Number=ATSAM4S8BA-ANR, Number of I/O=47, PackageDescription="64-Pin Quad Flat No-Lead (QFN) Sawn, 9 x 9 x 1.0 mm Body, 0.5 mm Pitch, Exposed Pad", PackageReference=64PS, PackageVersion="revJ, Jul-2007", Packaging="Cut Tape (CT)", Peripherals="Brown-out Detect/Reset, DMA, POR, PWM, WDT", Program Memory Size="512KB (512K x 8)", Program Memory Type=FLASH, RAM Size="128K x 8", Speed=120MHz, Supplier 1=Digi-Key
U2: library part NRF24, "nRF24 SMD Module", Warning="No power planes near or under device"
U3 U4: library part SV_CAT6219-330TDGT3, "IC REG LIN 3.3V 500MA TSOT23-5", Base Part Number=CAT6219, Current - Output=500mA, Package / Case="SOT-23-5 Thin, TSOT-23-5", Supplier Device Package=TSOT-23-5, Supplier Part Number=CAT6219-330TDGT3CT-ND, Voltage - Input (Max)=5.5V, Voltage - Output (Min/Fixed)=3.3V, Voltage Dropout (Max)="0.5V @ 500mA", ComponentLink1Description=http://www.onsemi.com/pub/Collateral/CAT6219-D.PDF, ComponentLink1URL=http://www.onsemi.com/pub/Collateral/CAT6219-D.PDF, ComponentLink2Description="CAT6219 Datasheet", ComponentLink2URL=\\maxwell\elecapp\AltiumDesigner\Libraries\DatasheetsNew\ENCE461\CAT6219-D.PDF, Manufacturer Part Number=CAT6219-330TDGT3, Supplier=Digi-Key, Supplier 1=Digi-Key
U5: "1.8V - 5V level converter"
U6: library part ADP2302ARDZ-5.0-R7, "IC REG BUCK 5V 2A 8SOIC", Current - Output=2A, Frequency - Switching=700kHz, Supplier Part Number 1=ADP2302ARDZ-5.0-R7CT-ND, Voltage - Input (Max)=20V, Voltage - Output (Min/Fixed)=5V, ComponentLink1Description="ADP2302ARDZ-5.0 Datasheet", ComponentLink1URL=\\maxwell\elecapp\AltiumDesigner\Libraries\DatasheetsNew\ENCE461\ADP2302_2303.pdf, Manufacturer_Part_Number=ADP2302ARDZ-5.0-R7, Output Type=Fixed, Supplier 1=Digi-Key, Type=DEV, Vendor="Analog Devices Inc"
U7: "Accelerometer 3-Axis, +/-2 g / +/-4 g / +/-8 g / +/-16 g with Digital Output, 1.6 KHz BW, Industrial, 14-pin LGA, Tray", Manufacturer="Analog Devices", Supply Current="140 uA", Voltage Supply (V)="2.0 to 3.6", # of Axes=3, -3dB Bandwidth="1.6 KHz", ComponentLink1Description="Manufacturer URL", ComponentLink1URL=http://www.analog.com/en/index.html, ComponentLink2Description=Datasheet, ComponentLink2URL=http://www.analog.com/static/imported-files/data_sheets/ADXL345.pdf, ComponentLink3Description="Package Specification", ComponentLink3URL=http://www.analog.com/static/imported-files/data_sheets/ADXL343.pdf, ComponentLink4Description="Product URL", ComponentLink4URL=http://www.analog.com/en/mems-sensors/mems-inertial-sensors/adxl345/products/product.html, DatasheetVersion="Rev. D", Manufacturer 1="Analog Devices", Manufacturer Part Number 1=ADXL345BCCZ, Mounting Technology="Surface Mount", Output Type=Digital, PackageDescription="14-Pin Land Grid Array, 3 x 5 mm Body, 0.8 mm Pitch", PackageReference=CC-14-1, PackageVersion="03-16-2010-A, 03/2010", Packing=Tray, PartNumber=ADXL345BCCZ, Sensitivity="256/128/64/32 LSB/g"
Y1: library part XT_CRYSTAL_12MHz_18pF, "CRYSTAL 12MHZ 18PF 6X3.5mm SMD", ESR (Equivalent Series Resistance)="60 Ohm", Frequency Stability=±50ppm, Frequency Tolerance=±30ppm, Load Capacitance=18pF, Manufacturer="CTS-Frequency Controls", Manufacturer Part Number=406C35D12M00000, Operating Mode=Fundamental, Operating Temperature="-20°C ~ 70°C", Package / Case="4-SMD, No Lead (DFN, LCC)", Supplier Part Number 1=CTX855CT-ND, Frequency=12MHz, Height="0.047\" (1.20mm)", Mounting Type="Surface Mount", Size / Dimension="0.236\" L x 0.138\" W (6.00mm x 3.50mm)", Supplier 1=Digi-Key

## Via types
v1: diameter 1, hole 0.5, Top Layer to Bottom Layer, 53 vias
v2: diameter 2, hole 1.5, Top Layer to Bottom Layer, 1 vias

## Nets (pads, with @x,y where several pads share a name; then routed paths per layer and width w, separated by ;. In a path a pad name is that pad's centre, name@x,y a point inside that pad or via, vN(x,y) a via of type N, cw(c..) or ccw(c..) an arc to the next point about the centre after c; other vN are vias at no path point)
3V3: C5.2 C9.2 C11.2 C13.2 C15.2 C19.2 C23.2 C29.2 C30.2 DL1.2 DL2.2 H7.7 H7.8 R12.2 R13.2 TP2.1 TP_3V3.1 U1.1 U1.7 U1.18 U1.45 U1.58 U3.5 U5.6 U7.1 U7.6 U7.7 | length 47.6
  Top Layer w0.3: v1(14.7,45.2) C23.2 16.1,43.55 U5.6 ; v1(23.3,64.1) 23.434,63.966 23.434,63.768 24.002,63.2 C9.2 24.75,63.25 U1.18 ; C5.2 v1(32.1,68.2) 32.75,67.55 U1.7 ; C11.2 33.9,50.976 34.076,50.8 v1(34.9,50.8) ; C11.2@33.9,52.3 33.9,52.9 34.225,53.225 34.225,54.45 U1.45 ; U1.1 35.75,66.655 35.926,66.831 v1@36.531,66.831 ; TP2.1 38.774,44.3 39.274,44.8 v1(39.3,44.8) ; v1(36.6,66.9) 36.734,67.034 37.034,67.034 37.5,67.5 C15.2 ; U1.58 40.25,60.75 40.5,60.5 41,60.5 C13.2 42.6,60.3 v1(42.7,60.4) ; v1(38,37.9) 38.1,38 R13.2 ; C29.2 40.5,32.1 v1(39.8,32.1) 39.934,32.234 39.934,32.584 40.3,32.95 40.3,33.05 40.5,33.25 R12.2 41.375,34.025 U7.1 ; C30.2 47.278,32.478 47.278,33.178 v1(47.3,33.2) 47.166,33.334 46.691,33.334 U7.6 46.725,34.75 U7.7 ; DL2.2 51.882,39.482 v1(51.9,39.5)
  Top Layer w0.6: U3.5 23.35,40.45 C19.2 v1(23.4,41.9)
  Top Layer w1: TP_3V3.1 v1(43.5,4.4)
3V3RF: C21.2 L1.2 TP_3V3RF.1 U4.5 | length 11.1
  Top Layer w0.8: L1.2 6.2,55 7.25,53.95 7.25,52.425 U4.5@7.5,52.175 ; U4.5@7.85,52 C21.2 11.8,52 TP_3V3RF.1
5V: C18.2 C20.2 C22.2 C26.2 C27.2 L3.2 R11.2 R14.2 TP_5V.1 U3.1 U3.3 U4.1 U5.1 U6.5 | length 80.9
  Top Layer w0.3: R11.2 15.589,39.443 15.761,39.392 C22.2 ; U5.1 16.317,40.201 16.342,39.899 C22.2 ; TP_5V.1 17.768,37.012 16.814,38.538 C22.2 ; C18.2 33.65,23.95 R14.2
  Top Layer w0.6: C20.2 4.875,52.1 U4.1
  Top Layer w0.8: 2.1,48.8 2.1,51.525 2.675,52.1 C20.2 ; 22.75,35.45 22.75,34.9 23.1,34.55 C18.2 ; 22.807,35.507 U3.1 23.35,36.825 23.401,36.825 23.751,37.175 24.849,37.175 25.199,36.825 25.25,36.825 U3.3
  Top Layer w1: TP_5V.1 22.4,35.2
  Top Layer w1.5: 2.1,48.8 2.1,39 9.4,31.7 L3.2 11.6,29.55 C27.2 15.344,27.25 15.499,27.405 U6.5 17.45,28.166 C26.2 17.45,33.75 TP_5V.1
BATT_IN: F1.1 H6.2 | length 3.2
  Top Layer w1.5: F1.1 11.55,6.779 12.429,5.9 H6.2@14.056,5.9
BATT_OUT: C7.2 C8.2 C24.2 D1.1 Q1.2 R4.2 TP_BATT_OUT.1 U6.2 U6.3 | length 39.4
  Top Layer w0.8: U6.3 U6.2 22.501,24.865 22.766,24.6 C24.2 26.75,22.45 R4.2
  Top Layer w1: C7.2 Q1.2@5.15,10.2
  Top Layer w1.5: Q1.2@5.15,10.2 Q1.2 5.25,11.078 C8.2 9.811,14.511 10.36,15.06 10.36,16.335 11.825,17.8 D1.1 13.6,18.3 TP_BATT_OUT.1 20.7,18.3 24.6,22.2 C24.2
Buzzer: R16.1 R18.2 TP_BUZZER.1 U1.26 | length 41.7
  Top Layer w0.3: U1.26 27.624,59.25 27.8,59.074 27.8,55.9 25.2,53.3 25.2,43.25 36.45,32 R18.2 ; R16.1 37.5,26.85 TP_BUZZER.1 37.5,31.05 R18.2@36.55,32
CE: U1.29 U2.3 | length 25.3
  Top Layer w0.3: U2.3 6.186,59.9 10.686,55.4 21.3,55.4 21.8,55.9 21.8,57 22.55,57.75 U1.29
CHANNEL_SELECT_0: H5.1 U1.3 | length 18.5
  Top Layer w0.3: U1.3 34.75,69.85 43.9,79 H5.1
CHANNEL_SELECT_1: H4.1 U1.4 | length 15.6
  Top Layer w0.3: U1.4 34.25,72.25 39.3,77.3 H4.1
CHANNEL_SELECT_2: H3.1 U1.5 | length 13.6
  Top Layer w0.3: H3.1 33.75,78.75 U1.5
CHANNEL_SELECT_3: H1.1 U1.6 | length 15.8
  Top Layer w0.3: H1.1 27.7,77.7 33.25,72.15 U1.6
D_N: H2.2 R2.1 TP_DN.1 | length 15
  Top Layer w0.3: R2.1 46.25,58.9 46.523,59.173 48.606,59.173 49.106,58.673 50.277,58.673 51.25,57.7 TP_DN.1 52.75,57.7 53.723,58.673 55.187,58.673 56.112,59.598 59.602,59.598 H2.2
D_P: H2.3 R1.1 TP_DP.1 | length 15
  Top Layer w0.3: R1.1 46.25,60 46.523,59.727 48.836,59.727 49.336,59.227 50.277,59.227 51.25,60.2 TP_DP.1 52.75,60.2 53.723,59.227 54.958,59.227 55.883,60.152 59.602,60.152 H2.3
GND: C1.2 C2.1 C3.1 C4.1 C5.1 C6.1 C7.1 C8.1 C9.1 C10.1 C11.1 C12.1 C13.1 C14.1 C15.1 C17.1 C18.1 C19.1 C20.1 C21.1 C22.1 C23.1 C24.1 C26.1 C27.1 C28.1 C29.1 C30.1 D2.1 H1.2 H2.5 H2.6 H3.2 H4.2 H5.2 H6.1 H6.3 H7.5 H7.6 H8.3 Q2.2 R5.1 R6.1 R7.1 R8.1 R18.1 S1.1 S2.1 TP_GND.1 U1.2 U1.17 U1.46 U1.60 U2.2 U3.2 U4.2 U5.2 U5.5 U6.7 U6.EPAD U7.2 U7.4 U7.5 U7.12 | length 109.5
  Top Layer w0.3: U5.2 17.411,40.208 17.416,40.192 C22.1@17.6,39.5 ; U5.5 17.225,43.425 17.225,44.199 17.5,44.474 C23.1 18.558,45.2 18.735,45.376 v1(18.924,45.376) ; C22.1 v1(19.1,39.2) ; v1(21.7,60.3) C12.1 ; C9.1 25.811,64.6 25.977,64.766 v1@26.234,64.766 ; v1(26.3,64.9) 26.3,64.711 26.475,64.536 U1.17 ; v1(26.7,43.2) S2.1 ; C6.1 C10.1 v1(30.2,70.9) 31.1,70.9 31.3,71.1 C5.1 ; U1.46 34.75,53.15 35.107,52.793 35.107,52.4 35.207,52.3 C11.1@35.3,52.3 ; R18.1 34.925,31.875 34.925,30.575 v1(35,30.5) ; U1.2 35.25,67.05 36.15,67.95 ; C11.1 35.3,52.057 35.55,51.807 36.004,51.807 36.9,50.911 v1(36.9,50.8) ; C15.1 v1(36.1,69.9) ; U1.60 39.161,61.75 v1@39.311,61.6 ; C17.1 37.9,66.85 38.303,67.253 38.364,67.253 38.611,67.5 v1(38.8,67.5) ; v1(39.5,61.6) 39.6,61.7 C13.1 C4.1 ; v1(41.4,23.4) Q2.2@41.4,24.602 ; C29.1 v1(43.8,31.5) 43.934,31.634 43.934,32.104 44.4,32.57 U7.4@44.4,33.303 ; C29.1@42.5,31.7 42.5,32.2 42.8,32.5 U7.2 ; v1(42.7,67.5) C3.1 ; U7.12 v1(42.8,39.5) ; C14.1 44.211,50.6 44.411,50.8 v1(44.6,50.8) 45.4,51.6 R8.1 ; v1@44.189,31.7 C30.1 ; U7.4@44.515,33.187 U7.4@44.4,33.303 ; U7.5@44.93,34.1 44.475,34.1 U7.4 U7.4@44.4,33.303 ; v1(51.334,55.6) 51.45,55.6 R6.1
  Top Layer w0.6: v1(3.8,49) 3.723,49.077 3.723,49.702 3.375,50.05 C20.1 3.675,51 U4.2 ; U3.2 24.3,35.275 24.425,35.275 24.5,35.2 C18.1 v1(25.9,34.5) ; C19.1 v1(26.6,40.5)
  Top Layer w0.8: C28.1 6.2,43.95 6.73,44.48 H8.3 ; v1(9.575,49) C21.1 ; R7.1 v1(31,18.7)
  Top Layer w1: C7.1 v1(2.2,11.8) ; U2.2 4.905,59.9 4.904,59.7 C2.1 5.884,59 v1(6.284,58.6) ; R5.1 12.79,9.85 H6.1 ; C27.1 15.184,24.55 15.499,24.865 U6.7 18.365,24.865 v2(19,25.5) ; C26.1 v1(23.4,29.6) 24.6,28.4 24.6,26.4 ; v1(32.2,4.3) TP_GND.1 ; C1.2 58.65,56.7 59.525,57.575 59.55,57.575 59.65,57.675 H2.6@59.65,57.7 ; v1(59.3,22) S1.1 ; 59.65,61.8 H2.6@59.65,62.7 ; H2.6@62.3,56.593 H2.6@62.3,59.093 ; H2.6@62.4,61.278 H2.6@62.4,63.778
  Top Layer w1.5: v1(2.2,11.8) 3.539,13.139 C8.1 ; D2.1 v1(5.7,22.7)
IDLE_EN: U1.31 U4.3 | length 25.8
  Top Layer w0.3: U4.3 5.8,50.05 7.7,48.15 16.45,48.15 25.05,56.75 U1.31
INT1: TP_INT1.1 U1.38 U7.8 | length 28.2
  Top Layer w0.3: U1.38 30.75,51.557 32,50.307 32,50.3 33.2,49.1 33.2,43.8 35.15,41.85 TP_INT1.1 42.2,41.85 43.55,41.85 46,39.4 U7.8
INT2: TP_INT2.1 U1.37 U7.9 | length 28.2
  Top Layer w0.3: U1.37@30.25,53.85 30.25,51.35 31.5,50.1 31.5,43 34.1,40.4 43.73,40.4 45.2,38.93 U7.9
IRQ: U1.30 U2.8 | length 16.8
  Top Layer w0.3: U2.8 12.543,60.976 12.843,60.676 13.267,60.676 13.666,60.277 13.666,60.023 13.9,59.789 v1(13.9,59.6) ; v1(23.5,56.7) 23.634,56.834 24.023,56.834 24.439,57.25 U1.30
  Bottom Layer w0.3: v1(13.9,59.6) 17,56.5 22.974,56.5 23.04,56.566 23.366,56.566 v1(23.5,56.7)
LED_DATA: U1.32 U5.4 | length 16.3
  Top Layer w0.3: U5.4 23.5,48.75 23.5,53.275 U1.32
LED_OUTPUT: H8.2 U5.3 | length 8.8
  Top Layer w0.6: H8.2 14.34,41.94 14.6,42.2 17.774,42.2 18.125,41.849 18.125,41.025 U5.3
LED_POW: R4.1 R7.2 TP_LED.1 U1.10 | length 48.9
  Top Layer w0.3: R4.1 29.8,21.85 TP_LED.1 29.9,23.7 v1(29.9,25.5) ; U1.10 31.25,63.85 v1(31.3,63.8)
  Top Layer w0.8: R7.2 R4.1
  Bottom Layer w0.3: v1(29.9,25.5) 28.975,26.425 28.975,37.625 31.3,39.95 v1(31.3,63.8)
MISO: TP_MISO.1 U1.27 U2.7 | length 18.6
  Top Layer w0.3: U2.7 11.271,62.924 11.447,63.1 13.2,63.1 15.6,60.7 17.555,60.7 18.955,59.3 24.9,59.3 25.45,58.75 U1.27
MOSI: TP_MOSI.1 U1.22 U2.6 | length 19.5
  Top Layer w0.3: U2.6 10,63.289 10.311,63.6 16.645,63.6 18.245,62 TP_MOSI.1 20.25,61.25 U1.22
NetC2_2: C2.2 R19.1 U2.1 | length 5
  Top Layer w0.8: R19.1 1.8,58.3 2.5,59 C2.2 3.542,59.7 3.554,59.9 U2.1
NetC3_2: C3.2 U1.62 Y1.3 | length 11
  Top Layer w0.3: U1.62 38.65,62.75 39.238,63.338 39.238,63.783 39.428,63.972 ; 39.478,64.022 40.105,64.65 41.995,64.65 43.045,65.7 Y1.3 45.3,67.4 C3.2
NetC4_2: C4.2 U1.61 Y1.1 | length 7.9
  Top Layer w0.3: U1.61 38.948,62.25 39.676,62.978 40.578,62.978 Y1.1 42.9,63.3 43.757,62.443 43.757,61.943 C4.2
NetC6_2: C6.2 C10.2 U1.8 U1.12 | length 8.7
  Top Layer w0.3: U1.12 30.25,66.825 C6.2 C10.2 30.377,68.098 31.075,67.4 31.6,67.4 32.25,66.75 U1.8
NetC12_2: C12.2 C14.2 L2.2 U1.24 U1.54 | length 23.3
  Top Layer w0.3: C12.2 24.55,60.25 U1.24 27.75,60.25 29.25,58.75 U1.54 38.65,58.75 42.55,54.85 42.55,54.05 L2.2 C14.2
NetC16_1: C16.1 R8.2 | length 2.2
  Top Layer w0.3: R8.2 49.1,51.75 C16.1
NetC16_2: C16.2 C17.2 L2.1 U1.64 | length 23.4
  Top Layer w0.3: v1(34.3,62.5) 35.55,63.75 U1.64 37.525,64.425 C17.2 ; v1(45.9,55.6) L2.1 C16.2
  Bottom Layer w0.3: v1(34.3,62.5) 34.3,61.6 40.3,55.6 v1(45.9,55.6)
NetC25_1: C25.1 D2.2 L3.1 U6.8 | length 19.7
  Top Layer w1.5: L3.1 D2.2@10.075,24.025 ; D2.2@10.075,22.6 15.124,22.6 15.624,23.1 17.2,23.1 C25.1
NetC25_2: C25.2 U6.1 | length 2.3
  Top Layer w0.8: C25.2 21.295,23.595 U6.1
NetC28_2: C28.2 H8.1 R11.1 | length 10.3
  Top Layer w0.8: C28.2 7.75,39.4 H8.1 11.65,38.15 R11.1
NetD1_2: D1.2 Q1.1 R5.2 | length 8.1
  Top Layer w1.5: Q1.1 8.6,10.3 9.85,11.55 R5.2 13.1,14.05 D1.2
NetDL1_1: DL1.1 R9.1 | length 2.3
  Top Layer w0.3: R9.1 46.73,46.5 DL1.1 DL1.1@46.63,46.2 ; DL1.1@47.13,46.4 DL1.1@47.23,46.3
NetDL2_1: DL2.1 R10.1 | length 4.6
  Top Layer w0.3: R10.1 47,41.4 DL2.1
NetF1_2: F1.2 Q1.3 | length 2.9
  Top Layer w1.5: Q1.3 7.45,8.3 F1.2
NetL1_1: L1.1 R19.2 | length 1.7
  Top Layer w0.8: R19.2 2.5,56.15 2.5,56.146 2.523,56.123 L1.1
NetP1_1: P1.1 R14.1 R15.2 | length 15.3
  Top Layer w0.3: R14.1 37.2,20.4 P1.1 41.1,11.05 R15.2
NetP1_2: P1.2 Q2.3 R15.1 | length 17.7
  Top Layer w0.3: Q2.3 43.4,19.2 P1.2 46.1,11.25 R15.1
NetQ2_1: Q2.1 R17.1 | length 3.8
  Top Layer w0.3: R17.1 39.25,25.05 40.05,25.85 Q2.1@41.795,25.85
NetR1_2: R1.2 U1.57 | length 7.7
  Top Layer w0.3: U1.57 39.905,60.25 40.605,59.55 44.2,59.55 R1.2
NetR2_2: R2.2 U1.56 | length 7.6
  Top Layer w0.3: U1.56 39.698,59.75 40.398,59.05 44.55,59.05 44.75,58.85 R2.2
NetR16_2: R16.2 R17.2 | length 1.6
  Top Layer w0.3: R16.2 37.7,24.05 R17.2
NetTP1_1: TP1.1 U1.55 | length 17
  Top Layer w0.3: v1(34.5,59.7) 34.576,59.7 35.026,59.25 U1.55 ; v1(36.2,49) 36.2,48.811 36.5,48.511 36.5,47 TP1.1
  Bottom Layer w0.3: v1(34.5,59.7) 34.4,59.6 34.4,52.502 35.75,51.152 35.75,50.448 35.725,50.423 35.725,50.175 36,49.9 36,49.526 36.066,49.46 36.066,49.134 v1(36.2,49)
NPCS0: TP_CSN.1 U1.28 U2.4 | length 21.7
  Top Layer w0.3: U2.4 7.457,59.9 9.657,57.7 12.2,57.7 19.9,57.7 20.45,58.25 U1.28
nRST: H7.1 S1.2 U1.39 | length 45.2
  Top Layer w0.3: U1.39 31.25,51.764 33.114,49.9 36.7,49.9 52.455,34.145 57.217,34.145 58.171,35.099 59.049,35.099 H7.1 59.3,35.29 S1.2
SCL: R12.1 U1.36 U7.14 | length 28.6
  Top Layer w0.3: U1.36 29.75,40.75 34.75,35.75 U7.14 40.6,35.075 R12.1
SDA: R13.1 U1.43 U7.13 | length 22.2
  Top Layer w0.3: v1(32.3,52.8) 32.434,52.934 32.834,52.934 33.25,53.35 U1.43 ; v1(40.7,39.4) 40.731,39.369 40.731,38.219 40.95,38 41.885,38 42,37.885 U7.13
  Bottom Layer w0.3: v1(32.3,52.8) 32.3,51.8 33.7,50.4 33.7,46.4 v1(40.7,39.4)
SLEEP: S2.2 U1.35 | length 5.6
  Top Layer w0.3: S2.2 26.7,50.4 29.25,52.95 U1.35
SPCK: TP_SPCK.1 U1.21 U2.5 | length 22.5
  Top Layer w0.3: U2.5 8.729,62.9 9.929,64.1 17.7,64.1 18.226,64.626 18.65,64.626 19.5,65.476 TP_SPCK.1 20.174,65.226 20.774,65.226 24.25,61.75 U1.21
STAT0: R9.2 TP_STAT0.1 U1.48 | length 21.3
  Top Layer w0.3: U1.48 36.225,54.475 43.45,47.25 R9.2 ; R9.2@43.45,46.6 43.45,45.65 44.126,44.974 50.45,44.974 51.3,44.124 TP_STAT0.1
STAT1: R10.2 U1.47 | length 16.1
  Top Layer w0.3: U1.47 35.25,53.44 35.79,52.9 36.1,52.9 40.034,48.966 40.034,47.966 44.7,43.3 R10.2
SWCLK: H7.2 U1.53 | length 36.8
  Top Layer w0.3: U1.53 36.476,58.25 36.3,58.074 36.3,56.6 36.4,56.5 36.4,56.053 36.678,55.775 37.125,55.775 41.393,51.507 41.393,50.055 42.098,49.35 43.103,49.35 44.837,47.616 50.684,47.616 53.4,44.9 53.4,38.65 H7.2
SWDIO: H7.4 U1.51 | length 32.8
  Top Layer w0.3: U1.51 38.724,57.25 38.9,57.074 38.9,56 41.893,53.007 41.893,50.262 42.305,49.85 50.15,49.85 55.1,44.9 55.1,40.368 56.243,39.225 56.5,39.225 56.73,38.995 H7.4
USB_DETECT: R3.1 R6.2 U1.34 | length 31.2
  Top Layer w0.3: U1.34 28.75,55.85 29.2,56.3 v1(35.25,56.3) ; v1(52.6,51.1) R6.2 52.7,52.85 R3.1
  Bottom Layer w0.3: v1(35.25,56.3) 35.384,56.166 35.834,56.166 40,52 51.7,52 v1(52.6,51.1)
VBUS: C1.1 H2.1 R3.2 TP_VBUS.1 | length 11.4
  Top Layer w0.3: R3.2 R3.2@54.6,54.35 ; TP_VBUS.1 55.55,54.35 R3.2@54.6,54.35 ; H2.1 59.175,58.9 59.125,58.85 59.125,58.825 58.6,58.3 56.905,58.3 55.1,56.495 55.1,54.95 54.8,54.65 54.8,54.55 R3.2@54.6,54.35
pads on no net: H2.4 H7.3 H7.9 H7.10 MT1.1 MT2.1 MT3.1 U1.9 U1.11 U1.13 U1.14 U1.15 U1.16 U1.19 U1.20 U1.23 U1.25 U1.33 U1.40 U1.41 U1.42 U1.44 U1.49 U1.50 U1.52 U1.59 U1.63 U3.4 U4.4 U6.4 U6.6 U7.3 U7.10 U7.11 Y1.2 Y1.4

## Polygon pours and split planes (outlines as drawn)
GND on Ground Plane (split plane): 63.49,0.51 0.51,0.51 0.51,64.5 17,64.5 17,70.001 25.674,84.49 63.49,84.49
3V3 on Power Plane (split plane): 63.49,0.51 0.51,0.51 0.51,64.5 17,64.5 17,70.001 25.674,84.49 63.49,84.49

## Other copper
Ground Plane (plane layer: these items are gaps in the copper):
  pour cut-out: 0,85 0.1,84.9 17,84.9 17,64.5 0.094,64.5
  pour cut-out: 16.7,69.5 16.7,84.7 25.8,84.7
Power Plane (plane layer: these items are gaps in the copper):
  pour cut-out: 17,84.9 0.1,84.9 0.1,64.5 17,64.5
  pour cut-out: 16.7,69.5 16.7,84.7 25.8,84.7

## Silkscreen, mask and mechanical layers (free items; w line width, h text height)
Top Overlay:
  text "Group 26" at 54.05,18.817 h0.8
  text "Dominic McNulty" at 51.55,17.017 h0.8
  text "Conner Horn" at 52.65,15.45 h0.8
  text "Charlie Horne" at 51.95,13.75 h0.8
  text "Cade Hinman" at 53.35,11.85 h0.8
  text "-" at 28.5,7.9 h2
  text "+" at 28.6,5.267 h2
  text "-" at 28.6,2.4 h2
Board Outline:
  the board outline again, w0.254

## Dimensions
0,85 to 0,0 on Mechanical 1
64,86 to 0,86 on Mechanical 1

## Text inside footprints (layer, text, board x,y; h text height)
H1: Top Overlay "1" at 28.1,74.7 h1.52 r90
H2: Mechanical 1 "PCB Edge" at 64.62,58.05 h0.52 r90
H3: Top Overlay "1" at 33.9,74.7 h1.52 r90
H4: Top Overlay "1" at 39.7,74.7 h1.52 r90
H5: Top Overlay "1" at 45.5,74.7 h1.52 r90
H7: Top Overlay "9" at 60.02,46.68 h1.5 r90; Top Overlay "10" at 57.48,46.68 h1.5 r90; Top Overlay "1" at 60.02,33.62 h1.5 r90; Top Overlay "2" at 57.48,33.12 h1.5 r90
U2: Top Overlay "NO GND/ / POWER / PLANES / UNDER / OR NEARBY" at 3.743,66.675 h1.2
U6: Mechanical 13 "*" at 20.93,24.344 h1.27 r180